# Altium PCB MainBoardPCB_BKP.PcbDoc (part 17 of 35)
Units mm, origin at the board's own origin, x right, y up, seen from the top; angles counter-clockwise.
Board outline 258.95 x 308.86 mm, 16 copper layers (L1, L2 (GND), L3 (Sign), L4 (GND), L5 (Sign), L6 (PWR/GND), L7(PWR/GND), L8 (Plane_GND), L9 (PWR/GND), L10 (PWR/GND), L11 (PWR/GND), L12 (Sign), L13 (GND), L14 (Sign), L15 (GND), L16), stack 2.502 mm thick; 2361 components, 1770 nets, 8410 pads, 3259 vias.
Unrouted connection lines stored in the file: 4700.
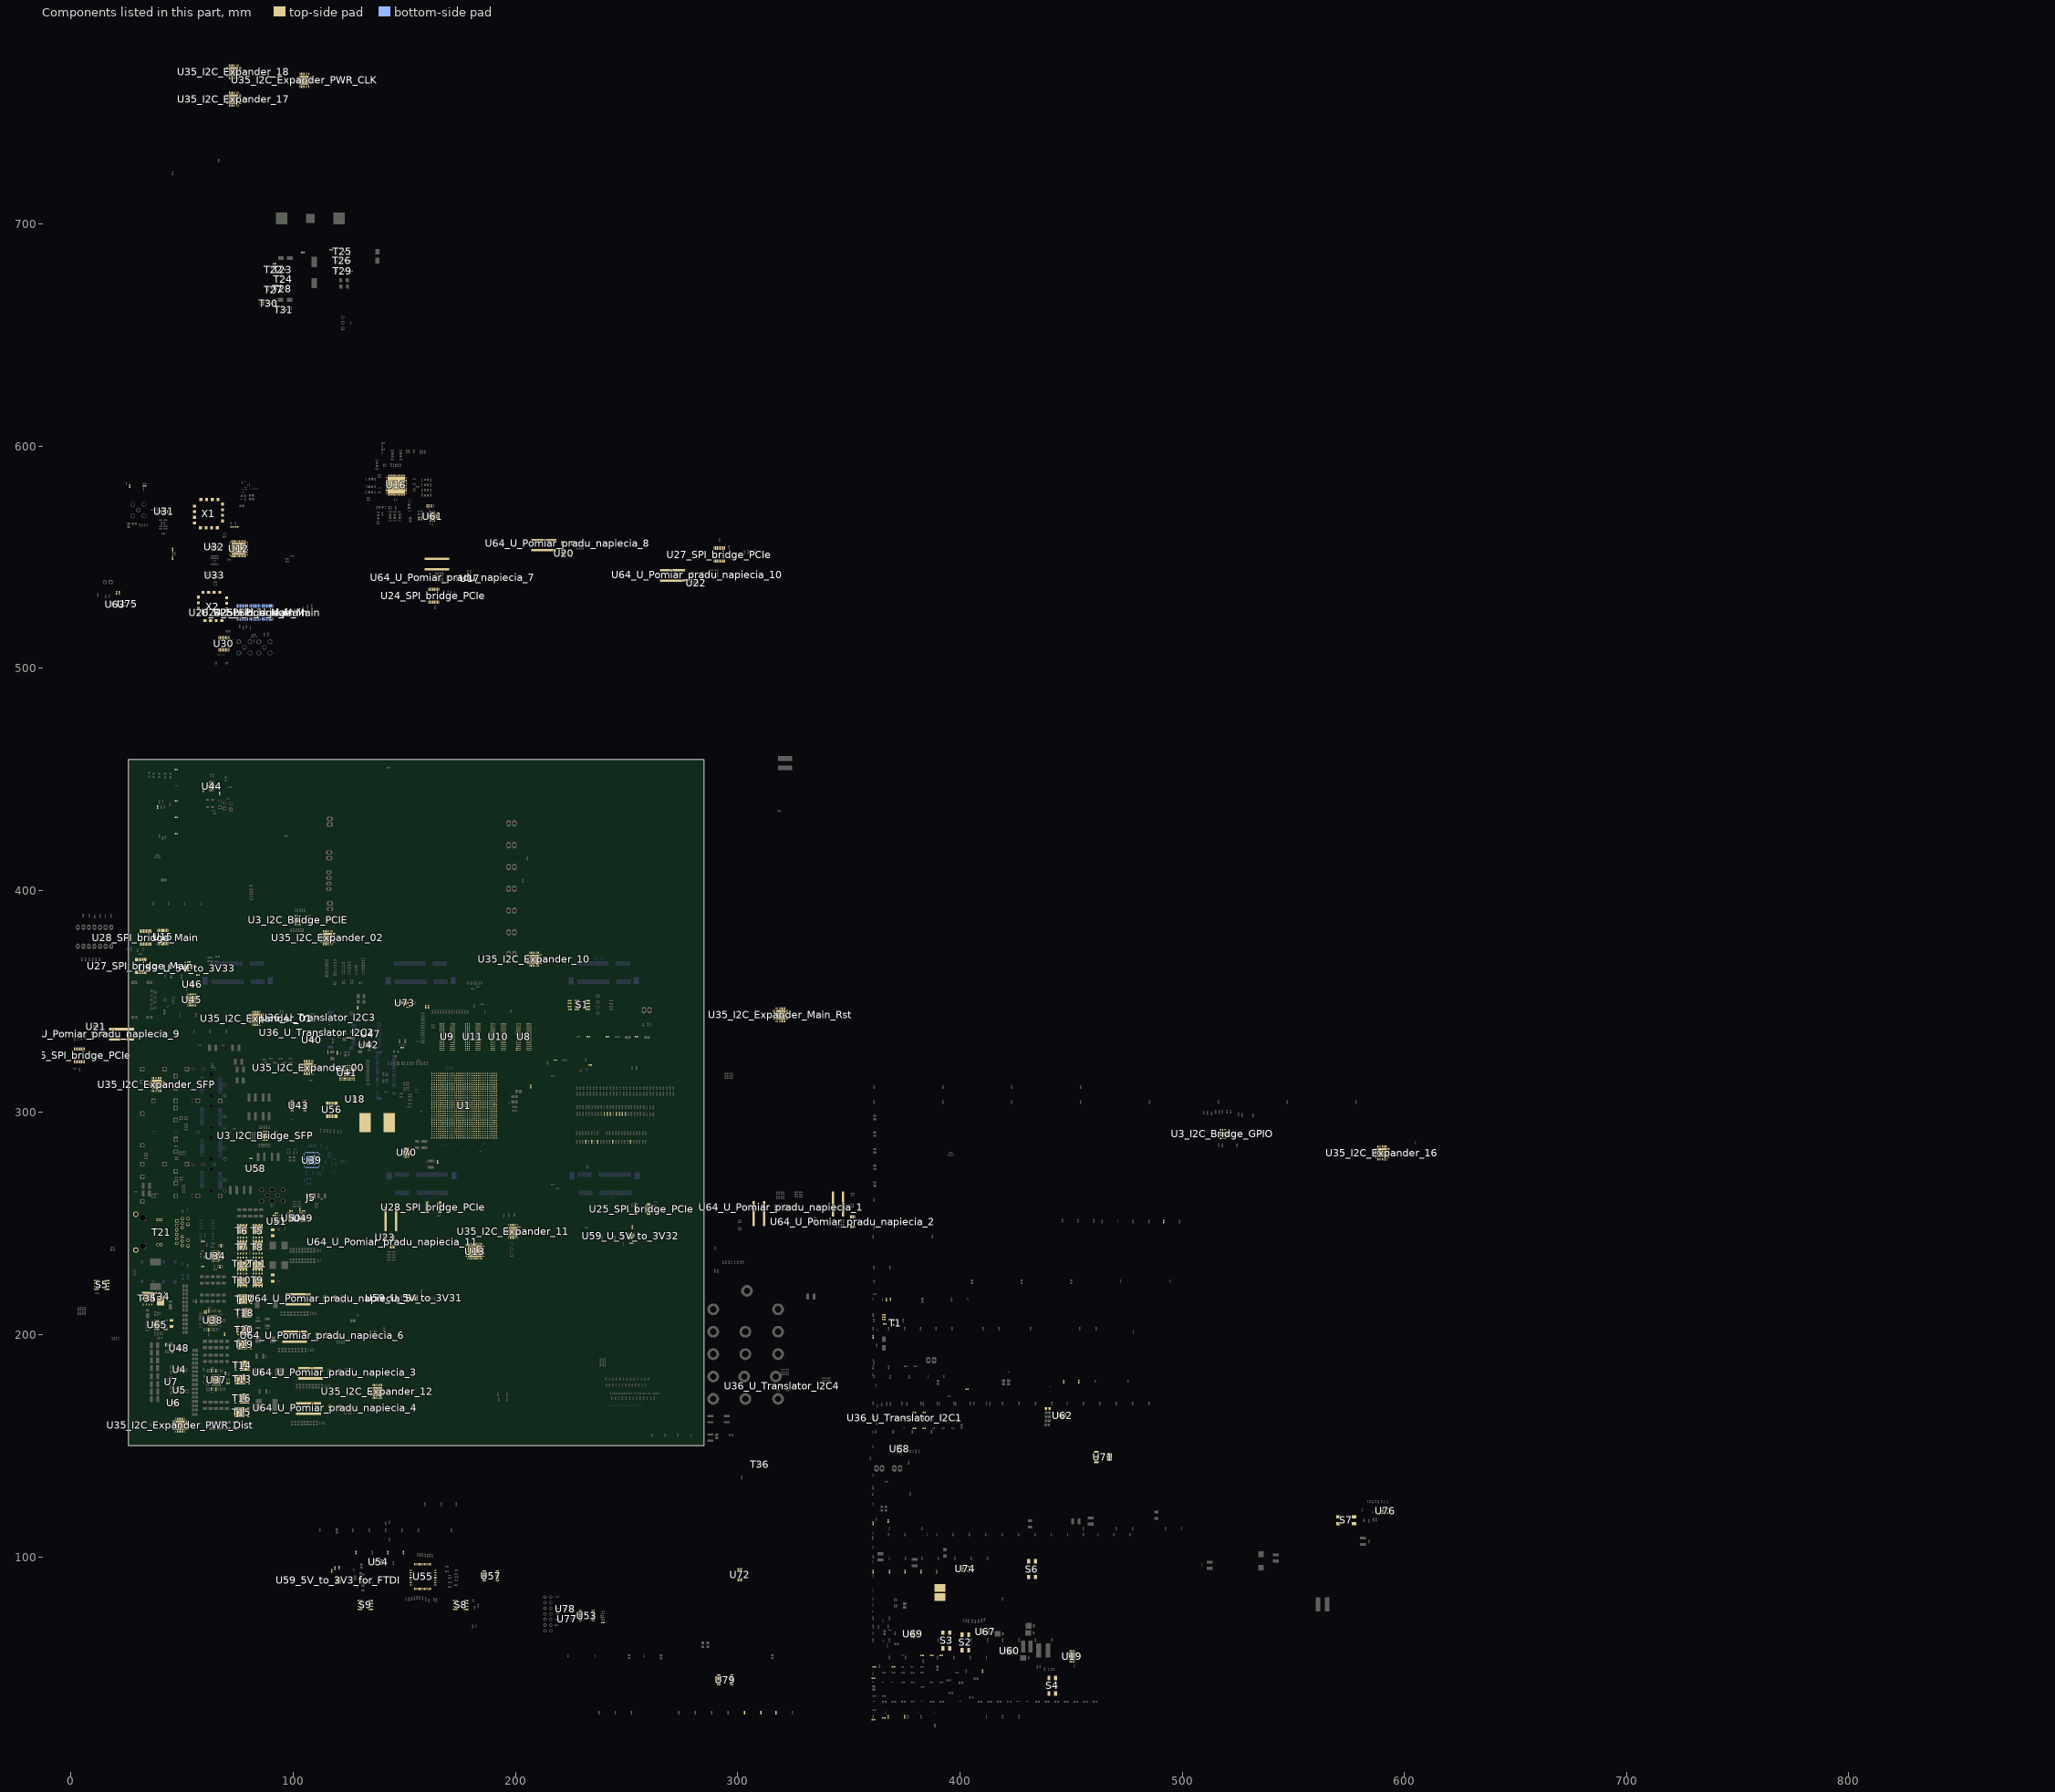
[diagram p21: the components of this part, seen from the top]

## Part data (continued)
R431_5V_to_3V3_for_FTDI R632 R633 R634 R646 R690 R825 R828: library part Resistor, Case/Package=0402, Case Code (Metric)=1005, Manufacturer 1=Panasonic, Manufacturer Part Number 1=ERA-2AED104X, Max Operating Temperature=155°C, Max Power Dissipation=63mW, Min Operating Temperature=-55°C, Package Quantity=10000, Supplier Part Number 1=P100KDECT-ND, Temperature Coefficient=25ppm/°C, Tolerance=0.5%, Voltage Rating=25V, Case Code (Imperial)=0402, ComponentLink1Description=https://datasheet.ciiva.com/24028/aoa0000ce26-197354-24028150.pdf?src-supplier=Mouser, ComponentLink1URL=https://datasheet.ciiva.com/24028/aoa0000ce26-197354-24028150.pdf?src-supplier=Mouser, ComponentLink2Description=https://datasheet.ciiva.com/43470/1776116-43470438.pdf?src-supplier=Farnell, ComponentLink2URL=https://datasheet.ciiva.com/43470/1776116-43470438.pdf?src-supplier=Farnell, ComponentLink3Description=https://datasheet.ciiva.com/7830/1776116-7830920.pdf?src-supplier=Element14, ComponentLink3URL=https://datasheet.ciiva.com/7830/1776116-7830920.pdf?src-supplier=Element14, ComponentLink4Description=https://datasheet.ciiva.com/46378/1776116-46378234.pdf?src-supplier=Element14, ComponentLink4URL=https://datasheet.ciiva.com/46378/1776116-46378234.pdf?src-supplier=Element14, ComponentLink5Description=https://datasheet.ciiva.com/16780/70068849-16780139.pdf?src-supplier=Allied+Electronics, ComponentLink5URL=https://datasheet.ciiva.com/16780/70068849-16780139.pdf?src-supplier=Allied+Electronics, ComponentLink6Description=https://datasheet.ciiva.com/9117/aoa0000ce26-9117229.pdf?src-supplier=Avnet, ComponentLink6URL=https://datasheet.ciiva.com/9117/aoa0000ce26-9117229.pdf?src-supplier=Avnet, ComponentLink7Description=https://datasheet.ciiva.com/16511/aoa0000ce26-16511566.pdf?src-supplier=Avnet+Asia, ComponentLink7URL=https://datasheet.ciiva.com/16511/aoa0000ce26-16511566.pdf?src-supplier=Avnet+Asia, ComponentLink8Description=https://datasheet.ciiva.com/30225/54aoa0000ce26-30225311.pdf?src-supplier=Onlinecomponents.com, ComponentLink8URL=https://datasheet.ciiva.com/30225/54aoa0000ce26-30225311.pdf?src-supplier=Onlinecomponents.com, Composition="Metal Film,Thin Film", Contact Plating=Tin, Depth=0.5mm, Height=0.016inch, Lead Free="Lead Free", Length=1mm, Military Standard=Not, Mount="Surface Mount", Number of Terminations=2, Packaging="Tape and Reel", Power Rating=63mW, Pricing 1="1=0.22000, 10=0.18800, 100=0.07350, 1000=0.03077, 2500=0.02820, 5000=0.02564 (USD)", Radiation Hardening=No, REACH SVHC="No SVHC", Resistance=100kR, RoHS=Yes, Stock 1=54338, Supplier 1=Digi-Key, Termination=SMD/SMT, Voltage Rating (DC)=25V, Width=0.5mm
R432_U_5V_to_3V31 R432_U_5V_to_3V32 R432_U_5V_to_3V33: library part Resistor, "RES 15K OHM 1% 1/16W 0402", Case Code (Imperial)=0402, Case Code (Metric)=1005, Manufacturer="Stackpole Electronics", Manufacturer Part Number=RMCF0402FT15K0, Max Operating Temperature=155°C, Max Power Dissipation=63mW, Min Operating Temperature=-55°C, Supplier Part Number 1=RMCF0402FT15K0CT-ND, Temperature Coefficient=100ppm/°C, Tolerance=1%, Case/Package=0402, Category="Chip SMD Resistors", ComponentLink1Description=http://www1.futureelectronics.com/doc/STACKPOLE%20ELECTRONICS/RMCF-1__16S-15K-1%25-R.pdf?src-supplier=Future+Electronics, ComponentLink1URL=http://www1.futureelectronics.com/doc/STACKPOLE%20ELECTRONICS/RMCF-1__16S-15K-1%25-R.pdf?src-supplier=Future+Electronics, ComponentLink2Description=http://components.arrow.com/part/dataview/50576585S147344N1174?src-supplier=Arrow, ComponentLink2URL=http://components.arrow.com/part/dataview/50576585S147344N1174?src-supplier=Arrow, ComponentLink3Description=https://www.seielect.com/catalog/sei-rmcf_rmcp.pdf?src-supplier=Digi-Key, ComponentLink3URL=https://www.seielect.com/catalog/sei-rmcf_rmcp.pdf?src-supplier=Digi-Key, ComponentLink4Description=https://www.seielect.com/catalog/SEI-RMCF_RMCP.pdf?src-supplier=Avnet, ComponentLink4URL=https://www.seielect.com/catalog/SEI-RMCF_RMCP.pdf?src-supplier=Avnet, Composition="Thick Film", Contact Plating=Tin,Matte, Features="Automotive AEC-Q200", Height=0.016inch, Lead Free="Lead Free", Length=0.039inch, Mount="Surface Mount", Number of Terminations=2, Packaging="Tape and Reel", Power Rating=63mW, Pricing 1="1=0,10000, 10=0,01400, 100=0,00580, 1000=0,00262, 2500=0,00228, 5000=0,00188 (USD)", Radiation Hardening=No, Resistance=15kR, RoHS=Yes, Stock 1=103132, Supplier 1=Digi-Key, Width=0.02inch
R433: library part Resistor, "RES 56K OHM 1% 1/16W 0402", Case Code (Imperial)=0402, Case Code (Metric)=1005, Manufacturer="Stackpole Electronics", Manufacturer Part Number=RMCF0402FT56K0, Max Operating Temperature=155°C, Max Power Dissipation=63mW, Min Operating Temperature=-55°C, Package Quantity=10000, Supplier Part Number 1=RMCF0402FT56K0CT-ND, Temperature Coefficient=100ppm/°C, Tolerance=1%, Case/Package=0402, Category="Chip SMD Resistors", ComponentLink1Description=https://www.seielect.com/catalog/SEI-RMCF_RMCP.pdf?src-supplier=Avnet, ComponentLink1URL=https://www.seielect.com/catalog/SEI-RMCF_RMCP.pdf?src-supplier=Avnet, ComponentLink2Description=http://www.seielect.com/Catalog/SEI-RMCF_RMCP.pdf?src-supplier=Digi-Key, ComponentLink2URL=http://www.seielect.com/Catalog/SEI-RMCF_RMCP.pdf?src-supplier=Digi-Key, ComponentLink3Description=https://www.seielect.com/catalog/SEI-Packaging.pdf?src-supplier=Digi-Key, ComponentLink3URL=https://www.seielect.com/catalog/SEI-Packaging.pdf?src-supplier=Digi-Key, ComponentLink4Description=https://www.seielect.com/Catalog/SEI-RMCF_RMCP.pdf?src-supplier=Digi-Key, ComponentLink4URL=https://www.seielect.com/Catalog/SEI-RMCF_RMCP.pdf?src-supplier=Digi-Key, Composition="Thick Film", Contact Plating=Tin,Matte, Features="Automotive AEC-Q200", Height=0.016inch, Length=0.039inch, Mount="Surface Mount", Number of Terminations=2, Packaging="Tape and Reel", Pricing 1="1=0,10000, 10=0,01400, 100=0,00580, 1000=0,00262, 2500=0,00228, 5000=0,00188 (USD)", Radiation Hardening=No, Resistance=56kR, RoHS=Yes, Stock 1=59738, Supplier 1=Digi-Key, Width=0.02inch
R434 R649 R651 R655 R656 R658: library part Resistor, "RES 10K OHM 0.1% 1/16W 0402", Case Code (Imperial)=0402, Case Code (Metric)=1005, Manufacturer="Stackpole Electronics", Manufacturer Part Number=RNCF0402BTE10K0, Max Operating Temperature=155°C, Max Power Dissipation=63mW, Min Operating Temperature=-55°C, Package Quantity=10000, Supplier Part Number 1=RNCF0402BTE10K0CT-ND, Temperature Coefficient=25ppm/°C, Tolerance=0.1%, Case/Package=0402, Category="Chip SMD Resistors", ComponentLink1Description=https://www.seielect.com/Catalog/SEI-rncf.pdf?src-supplier=Avnet, ComponentLink1URL=https://www.seielect.com/Catalog/SEI-rncf.pdf?src-supplier=Avnet, ComponentLink2Description=https://www.seielect.com/catalog/SEI-Packaging.pdf?src-supplier=Digi-Key, ComponentLink2URL=https://www.seielect.com/catalog/SEI-Packaging.pdf?src-supplier=Digi-Key, Composition="Thin Film", Contact Plating=Tin,Matte, Features="Moisture Resistant", Height=0.016inch, Length=0.039inch, Mount="Surface Mount", Number of Terminations=2, Packaging="Tape and Reel", Pricing 1="1=0,42000, 10=0,29900, 100=0,11950, 1000=0,05891, 2500=0,05457, 5000=0,04938 (USD)", Radiation Hardening=No, Resistance=10kR, RoHS=Yes, Stock 1=121200, Supplier 1=Digi-Key, Width=0.02inch
R435 R615: library part Resistor, Case/Package=0402, Case Code (Metric)=1005, Manufacturer=Yageo, Manufacturer Part Number=RC0402FR-0710KL, Max Operating Temperature=155°C, Min Operating Temperature=-55°C, Power Rating=62.5mW, Supplier Part Number 1=311-10.0KLRDKR-ND, Temperature Coefficient=100ppm/°C, Tolerance=1%, Voltage Rating=50V, Case Code (Imperial)=0402, ComponentLink1Description=https://datasheet.ciiva.com/7660/38568-7660787.pdf?src-supplier=Element14, ComponentLink1URL=https://datasheet.ciiva.com/7660/38568-7660787.pdf?src-supplier=Element14, ComponentLink2Description=https://datasheet.ciiva.com/7849/1784430-7849813.pdf?src-supplier=Element14, ComponentLink2URL=https://datasheet.ciiva.com/7849/1784430-7849813.pdf?src-supplier=Element14, ComponentLink3Description=https://datasheet.ciiva.com/7849/1686128-7849814.pdf?src-supplier=Element14, ComponentLink3URL=https://datasheet.ciiva.com/7849/1686128-7849814.pdf?src-supplier=Element14, ComponentLink4Description=https://datasheet.ciiva.com/7849/1784430-7849815.pdf?src-supplier=Element14, ComponentLink4URL=https://datasheet.ciiva.com/7849/1784430-7849815.pdf?src-supplier=Element14, ComponentLink5Description=https://datasheet.ciiva.com/22747/1018594-22747512.pdf?src-supplier=Element14, ComponentLink5URL=https://datasheet.ciiva.com/22747/1018594-22747512.pdf?src-supplier=Element14, ComponentLink6Description=https://datasheet.ciiva.com/12667/pyu-rc0402-51-rohs-l-6-r-12667067.pdf?src-supplier=Mouser, ComponentLink6URL=https://datasheet.ciiva.com/12667/pyu-rc0402-51-rohs-l-6-r-12667067.pdf?src-supplier=Mouser, ComponentLink7Description=https://datasheet.ciiva.com/7983/1018594-7983486.pdf?src-supplier=Element14, ComponentLink7URL=https://datasheet.ciiva.com/7983/1018594-7983486.pdf?src-supplier=Element14, Composition="Thick Film", Depth=0.5mm, Height=0.32mm, Lead Free="Lead Free", Lead Pitch=0.2mm, Length=1mm, Military Standard=Not, Number of Pins=2, Number of Terminations=2, Packaging="Tape and Reel", Pricing 1="1 = 0,10000, 10 = 0,01600, 100 = 0,00640, 1000 = 0,00289, 2500 = 0,00251, 5000 = 0,00207 (USD)", REACH SVHC="No SVHC", Resistance=10kR, RoHS=Yes, Stock 1=50506721, Supplier 1=Digi-Key, Termination=SMD/SMT, Voltage Rating (DC)=50V, Width=0.5mm, Working Voltage=50V
R436 R438: library part Resistor, "Thick Film Resistors - SMD 3.57K OHM 1%", Case Code (Imperial)=0402, Case Code (Metric)=1005, Manufacturer=Yageo, Manufacturer Part Number=RC0402FR-073K57L, Max Operating Temperature=155°C, Max Power Dissipation=63mW, Min Operating Temperature=-55°C, Power Rating=62.5mW, Supplier Part Number 1=YAG3150CT-ND, Temperature Coefficient=100ppm/°C, Tolerance=1%, Voltage Rating=50V, Case/Package=0402, Category="Chip SMD Resistors", ComponentLink1Description=https://datasheet.ciiva.com/16857/pyu-rc0402-51-rohs-l-6-16857623.pdf?src-supplier=Avnet+Europe, ComponentLink1URL=https://datasheet.ciiva.com/16857/pyu-rc0402-51-rohs-l-6-16857623.pdf?src-supplier=Avnet+Europe, ComponentLink2Description=https://datasheet.ciiva.com/8893/pyu-rc0402-51-rohs-l-6-8893597.pdf?src-supplier=Avnet, ComponentLink2URL=https://datasheet.ciiva.com/8893/pyu-rc0402-51-rohs-l-6-8893597.pdf?src-supplier=Avnet, Composition="Thick Film", Contact Plating=Tin,Matte, Depth=0.5mm, Features="Moisture Resistant", Height=0.016inch, Lead Free="Lead Free", Length=1mm, Military Standard=Not, Number of Terminations=2, Packaging="Tape and Reel", Pricing 1="1=0,10000, 10=0,01600, 100=0,00640, 1000=0,00289, 2500=0,00251, 5000=0,00207 (USD)", Resistance=3.57kR, RoHS=Yes, Stock 1=898047, Supplier 1=Digi-Key, Termination=SMD/SMT, Width=0.02inch, Working Voltage=50V
R437 R439: library part Resistor, "Res General Purpose Thick Film 0402 1.15K Ohm 1% 1/16W ±100ppm/°C Molded SMD Paper T/R", Case Code (Imperial)=0402, Case Code (Metric)=1005, Manufacturer=Yageo, Manufacturer Part Number=RC0402FR-071K15L, Max Operating Temperature=155°C, Max Power Dissipation=63mW, Min Operating Temperature=-55°C, Power Rating=62.5mW, Supplier Part Number 1=YAG3033CT-ND, Temperature Coefficient=100ppm/°C, Tolerance=1%, Voltage Rating=50V, Case/Package=0402, Category="Chip SMD Resistors", ComponentLink1Description=https://datasheet.ciiva.com/16856/pyu-rc0402-51-rohs-l-6-16856533.pdf?src-supplier=Avnet+Europe, ComponentLink1URL=https://datasheet.ciiva.com/16856/pyu-rc0402-51-rohs-l-6-16856533.pdf?src-supplier=Avnet+Europe, ComponentLink2Description=https://datasheet.ciiva.com/28418/pyu-rc0402-51-rohs-l-6-28418808.pdf?src-supplier=Avnet+Europe, ComponentLink2URL=https://datasheet.ciiva.com/28418/pyu-rc0402-51-rohs-l-6-28418808.pdf?src-supplier=Avnet+Europe, ComponentLink3Description=https://datasheet.ciiva.com/8895/pyu-rc0402-51-rohs-l-6-8895884.pdf?src-supplier=Avnet, ComponentLink3URL=https://datasheet.ciiva.com/8895/pyu-rc0402-51-rohs-l-6-8895884.pdf?src-supplier=Avnet, ComponentLink4Description=https://datasheet.ciiva.com/26829/getdatasheetpartid-326427-26829948.pdf?src-supplier=Verical, ComponentLink4URL=https://datasheet.ciiva.com/26829/getdatasheetpartid-326427-26829948.pdf?src-supplier=Verical, Composition="Thick Film", Contact Plating=Tin,Matte,Lead, Depth=0.5mm, Features="Moisture Resistant", Height=0.016inch, Lead Free="Lead Free", Length=1mm, Military Standard=Not, Number of Terminations=2, Packaging="Tape and Reel", Pricing 1="1=0,10000, 10=0,01600, 100=0,00640, 1000=0,00289, 2500=0,00251, 5000=0,00207 (USD)", Radiation Hardening=No, Resistance=1.15kR, RoHS=Yes, Stock 1=186720, Supplier 1=Digi-Key, Termination=SMD/SMT, Voltage Rating (DC)=50V, Width=0.02inch
R440 R441: library part Resistor, "RES SMD 20K OHM 1% 1/16W 0402", Case Code (Imperial)=0402, Case Code (Metric)=1005, Manufacturer=Vishay, Manufacturer Part Number=CRCW040220K0FKED, Max Operating Temperature=155°C, Max Power Dissipation=63mW, Min Operating Temperature=-55°C, Package Quantity=10, Supplier Part Number 1=51X8496, Temperature Coefficient=100ppm/°C, Tolerance=1%, Voltage Rating=50V, Case/Package=0402, Category="Chip SMD Resistors", ComponentLink1Description=https://datasheet.ciiva.com/11810/0900766b80d98824-11810023.pdf?src-supplier=RSComponents, ComponentLink1URL=https://datasheet.ciiva.com/11810/0900766b80d98824-11810023.pdf?src-supplier=RSComponents, ComponentLink2Description=https://datasheet.ciiva.com/2463/dcrcwe3-2463139.pdf?src-supplier=Digi-Key, ComponentLink2URL=https://datasheet.ciiva.com/2463/dcrcwe3-2463139.pdf?src-supplier=Digi-Key, ComponentLink3Description=https://datasheet.ciiva.com/2463/dcrcwe3-2463140.pdf?src-supplier=Digi-Key, ComponentLink3URL=https://datasheet.ciiva.com/2463/dcrcwe3-2463140.pdf?src-supplier=Digi-Key, ComponentLink4Description=https://datasheet.ciiva.com/16886/dcrcwe3-16886581.pdf?src-supplier=Avnet+Europe, ComponentLink4URL=https://datasheet.ciiva.com/16886/dcrcwe3-16886581.pdf?src-supplier=Avnet+Europe, ComponentLink5Description=https://datasheet.ciiva.com/15159/getdatasheetpartid-93312-15159927.pdf?src-supplier=Verical, ComponentLink5URL=https://datasheet.ciiva.com/15159/getdatasheetpartid-93312-15159927.pdf?src-supplier=Verical, ComponentLink6Description=https://datasheet.ciiva.com/2463/dcrcwe3-2463141.pdf?src-supplier=Digi-Key, ComponentLink6URL=https://datasheet.ciiva.com/2463/dcrcwe3-2463141.pdf?src-supplier=Digi-Key, ComponentLink7Description=https://datasheet.ciiva.com/3256/dcrcwe3-3256213.pdf?src-supplier=Avnet, ComponentLink7URL=https://datasheet.ciiva.com/3256/dcrcwe3-3256213.pdf?src-supplier=Avnet, ComponentLink8Description=https://datasheet.ciiva.com/16725/70201119-16725214.pdf?src-supplier=Allied+Electronics, ComponentLink8URL=https://datasheet.ciiva.com/16725/70201119-16725214.pdf?src-supplier=Allied+Electronics, Composition="Thick Film", Contact Plating=Tin, Depth=0.5mm, Features="Automotive AEC-Q200", Height=0.35mm, Lead Free="Lead Free", Length=1mm, Military Standard=Not, Mount="Surface Mount", Number of Pins=2, Number of Terminations=2, Packaging="Tape and Reel", Power Rating=63mW, Radiation Hardening=No, REACH SVHC=Unknown, Resistance=20kR, RoHS=Yes, Supplier 1=Newark, Termination=SMD/SMT, Voltage Rating (DC)=50V, Weight=2.3E-05oz, Width=0.5mm, Working Voltage=50V
R443: library part Resistor, "Panasonic ERA Series Thin Film Surface Mount Fixed Resistor 0805 Case 698k 0.1% 0.125W 25ppm/C", Case Code (Imperial)=0805, Case Code (Metric)=2012, Manufacturer=Panasonic, Manufacturer Part Number=ERA-6AEB6983V, Max Operating Temperature=155°C, Max Power Dissipation=125mW, Min Operating Temperature=-55°C, Package Quantity=5000, Supplier Part Number 1=P698KDACT-ND, Temperature Coefficient=25ppm/°C, Tolerance=0.1%, Voltage Rating=100V, Case/Package=0805, Category="Chip SMD Resistors", ComponentLink1Description=https://datasheet.ciiva.com/11810/0900766b80eb1d8c-11810720.pdf?src-supplier=RSComponents, ComponentLink1URL=https://datasheet.ciiva.com/11810/0900766b80eb1d8c-11810720.pdf?src-supplier=RSComponents, ComponentLink2Description=https://datasheet.ciiva.com/41450/001181413-da-01-en-widerstand-era-0805-698k-0-1-5000st-41450573.pdf?src-supplier=Conrad, ComponentLink2URL=https://datasheet.ciiva.com/41450/001181413-da-01-en-widerstand-era-0805-698k-0-1-5000st-41450573.pdf?src-supplier=Conrad, ComponentLink3Description=https://datasheet.ciiva.com/6138/485442-6138277.pdf?src-supplier=Farnell, ComponentLink3URL=https://datasheet.ciiva.com/6138/485442-6138277.pdf?src-supplier=Farnell, ComponentLink4Description=https://datasheet.ciiva.com/9180/aoa0000ce26-9180341.pdf?src-supplier=Avnet, ComponentLink4URL=https://datasheet.ciiva.com/9180/aoa0000ce26-9180341.pdf?src-supplier=Avnet, ComponentLink5Description=https://datasheet.ciiva.com/17205/aoa0000ce26-17205334.pdf?src-supplier=Avnet+Europe, ComponentLink5URL=https://datasheet.ciiva.com/17205/aoa0000ce26-17205334.pdf?src-supplier=Avnet+Europe, ComponentLink6Description=https://datasheet.ciiva.com/6138/485442-6138279.pdf?src-supplier=Farnell, ComponentLink6URL=https://datasheet.ciiva.com/6138/485442-6138279.pdf?src-supplier=Farnell, ComponentLink7Description=https://datasheet.ciiva.com/7753/485442-7753914.pdf?src-supplier=Element14, ComponentLink7URL=https://datasheet.ciiva.com/7753/485442-7753914.pdf?src-supplier=Element14, ComponentLink8Description=https://datasheet.ciiva.com/7753/485442-7753915.pdf?src-supplier=Element14, ComponentLink8URL=https://datasheet.ciiva.com/7753/485442-7753915.pdf?src-supplier=Element14, Composition="Thin Film,Metal Film", Contact Plating=Tin, Depth=1.25mm, Features="Automotive AEC-Q200", Height=0.5mm, Lead Free="Lead Free", Length=2mm, Mount="Surface Mount", Number of Pins=2, Number of Terminations=2, Packaging="Tape and Reel", Power Rating=125mW, Pricing 1="1=0,36000, 10=0,30200, 100=0,11820, 1000=0,04948, 2500=0,04536 (USD)", Radiation Hardening=No, REACH SVHC="No SVHC", Resistance=698kR, RoHS=Yes, Stock 1=9459, Supplier 1=Digi-Key, Termination=SMD/SMT, Voltage Rating (DC)=100V, Weight=0.000194oz, Width=1.25mm
R444 R445: library part Resistor, "Res Thin Film 0402 49.9K Ohm 0.1% 1/16W 25ppm/C Molded SMD SMD Punched Carrier T/R", Case Code (Imperial)=0402, Case Code (Metric)=1005, Manufacturer=Panasonic, Manufacturer Part Number=ERA-2AEB4992X, Max Operating Temperature=155°C, Max Power Dissipation=63mW, Min Operating Temperature=-55°C, Package Quantity=1, Power Rating=62.5mW, Supplier Part Number 1=P49.9KDCCT-ND, Temperature Coefficient=25ppm/°C, Tolerance=0.1%, Voltage Rating=50V, Case/Package=0402, Category="Chip SMD Resistors", ComponentLink1Description=https://datasheet.ciiva.com/9189/aoa0000ce26-9189149.pdf?src-supplier=Avnet, ComponentLink1URL=https://datasheet.ciiva.com/9189/aoa0000ce26-9189149.pdf?src-supplier=Avnet, Composition="Thin Film", Contact Plating=Tin, Depth=0.5mm, Features="Automotive AEC-Q200", Height=0.016inch, Lead Free="Lead Free", Length=1mm, Military Standard=Not, Mount="Surface Mount", Number of Terminations=2, Packaging="Tape and Reel", Pricing 1="1=0,43000, 10=0,30500, 100=0,12220, 1000=0,06021, 2500=0,05579, 5000=0,05047 (USD)", REACH SVHC=Unknown, Resistance=49.9kR, RoHS=Yes, Stock 1=70823, Supplier 1=Digi-Key, Voltage Rating (DC)=50V, Width=0.02inch
R446 R447: library part Resistor, "RES SMD 120 OHM 1% 1/16W 0402", Case/Package=0402, Case Code (Metric)=1005, Manufacturer=Vishay, Manufacturer Part Number=CRCW0402120RFKED, Max Operating Temperature=155°C, Max Power Dissipation=63mW, Min Operating Temperature=-55°C, Package Quantity=10000, Supplier Part Number 1=541-120LCT-ND, Temperature Coefficient=100ppm/°C, Tolerance=1%, Voltage Rating=50V, Case Code (Imperial)=0402, Category="Chip SMD Resistors", ComponentLink1Description=https://datasheet.ciiva.com/11817/0900766b80d98824-11817989.pdf?src-supplier=RSComponents, ComponentLink1URL=https://datasheet.ciiva.com/11817/0900766b80d98824-11817989.pdf?src-supplier=RSComponents, ComponentLink2Description=https://datasheet.ciiva.com/2463/dcrcwe3-2463109.pdf?src-supplier=Digi-Key, ComponentLink2URL=https://datasheet.ciiva.com/2463/dcrcwe3-2463109.pdf?src-supplier=Digi-Key, ComponentLink3Description=https://datasheet.ciiva.com/8336/dcrcwe3-8336661.pdf?src-supplier=Avnet, ComponentLink3URL=https://datasheet.ciiva.com/8336/dcrcwe3-8336661.pdf?src-supplier=Avnet, ComponentLink4Description=https://datasheet.ciiva.com/2463/dcrcwe3-2463110.pdf?src-supplier=Digi-Key, ComponentLink4URL=https://datasheet.ciiva.com/2463/dcrcwe3-2463110.pdf?src-supplier=Digi-Key, ComponentLink5Description=https://datasheet.ciiva.com/5550/dcrcwe3-109170-5550502.pdf?src-supplier=Mouser, ComponentLink5URL=https://datasheet.ciiva.com/5550/dcrcwe3-109170-5550502.pdf?src-supplier=Mouser, ComponentLink6Description=https://datasheet.ciiva.com/2463/dcrcwe3-2463111.pdf?src-supplier=Digi-Key, ComponentLink6URL=https://datasheet.ciiva.com/2463/dcrcwe3-2463111.pdf?src-supplier=Digi-Key, ComponentLink7Description=https://datasheet.ciiva.com/3256/dcrcwe3-3256009.pdf?src-supplier=Avnet, ComponentLink7URL=https://datasheet.ciiva.com/3256/dcrcwe3-3256009.pdf?src-supplier=Avnet, ComponentLink8Description=https://datasheet.ciiva.com/7777/1697337-7777194.pdf?src-supplier=Element14, ComponentLink8URL=https://datasheet.ciiva.com/7777/1697337-7777194.pdf?src-supplier=Element14, ComponentLink9Description=https://datasheet.ciiva.com/7777/1697337-7777195.pdf?src-supplier=Element14, ComponentLink9URL=https://datasheet.ciiva.com/7777/1697337-7777195.pdf?src-supplier=Element14, ComponentLink10Description=https://datasheet.ciiva.com/16881/dcrcwe3-16881548.pdf?src-supplier=Avnet+Europe, ComponentLink10URL=https://datasheet.ciiva.com/16881/dcrcwe3-16881548.pdf?src-supplier=Avnet+Europe, ComponentLink11Description=https://datasheet.ciiva.com/16199/dcrcwe3-16199070.pdf?src-supplier=Future+Electronics, ComponentLink11URL=https://datasheet.ciiva.com/16199/dcrcwe3-16199070.pdf?src-supplier=Future+Electronics, ComponentLink12Description=https://datasheet.ciiva.com/22674/1912744-22674687.pdf?src-supplier=Element14, ComponentLink12URL=https://datasheet.ciiva.com/22674/1912744-22674687.pdf?src-supplier=Element14, Composition="Thick Film", Contact Plating=Tin, Depth=0.5mm, Features="Automotive AEC-Q200", Height=0.35mm, Lead Free="Lead Free", Length=1mm, Military Standard=Not, Mount="Surface Mount", Number of Terminations=2, Packaging="Tape and Reel", Power Rating=63mW, Pricing 1="1=0,10000, 10=0,03600, 100=0,01460, 1000=0,00657, 2500=0,00570, 5000=0,00471 (USD)", Radiation Hardening=No, REACH SVHC=Unknown, Resistance=120R, RoHS=Yes, Stock 1=140153, Supplier 1=Digi-Key, Termination=SMD/SMT, Voltage Rating (DC)=50V, Weight=2.3E-05oz, Width=0.02inch, Working Voltage=50V
R448_U_Pomiar_pradu_napiecia_1 R448_U_Pomiar_pradu_napiecia_2 R448_U_Pomiar_pradu_napiecia_3 R448_U_Pomiar_pradu_napiecia_4 R448_U_Pomiar_pradu_napiecia_5 R448_U_Pomiar_pradu_napiecia_6 R448_U_Pomiar_pradu_napiecia_7 R448_U_Pomiar_pradu_napiecia_8 R448_U_Pomiar_pradu_napiecia_9 R448_U_Pomiar_pradu_napiecia_10 R448_U_Pomiar_pradu_napiecia_11: "RES SMD 5 MOHM 5W 4320 WIDE", Case/Package=Metal, Manufacturer=Ohmite, Max Operating Temperature=155°C, Max Power Dissipation=5W, Min Operating Temperature=-55°C, Package Quantity=1, Resistance=5mR, Supplier Part Number 1=FCSL110R005FERCT-ND, Temperature Coefficient=50ppm/°C, Tolerance=1%, ComponentLink1Description=https://datasheet.ciiva.com/2484/res-fcsl-2484643.pdf?src-supplier=Digi-Key, ComponentLink1URL=https://datasheet.ciiva.com/2484/res-fcsl-2484643.pdf?src-supplier=Digi-Key, ComponentLink2Description=https://datasheet.ciiva.com/2484/res-fcsl-2484644.pdf?src-supplier=Digi-Key, ComponentLink2URL=https://datasheet.ciiva.com/2484/res-fcsl-2484644.pdf?src-supplier=Digi-Key, ComponentLink3Description=https://datasheet.ciiva.com/2484/res-fcsl-2484645.pdf?src-supplier=Digi-Key, ComponentLink3URL=https://datasheet.ciiva.com/2484/res-fcsl-2484645.pdf?src-supplier=Digi-Key, ComponentLink4Description=https://datasheet.ciiva.com/6181/fcsl-6181333.pdf?src-supplier=Farnell, ComponentLink4URL=https://datasheet.ciiva.com/6181/fcsl-6181333.pdf?src-supplier=Farnell, ComponentLink5Description=https://datasheet.ciiva.com/46422/1812595-46422917.pdf?src-supplier=Element14, ComponentLink5URL=https://datasheet.ciiva.com/46422/1812595-46422917.pdf?src-supplier=Element14, ComponentLink6Description=https://datasheet.ciiva.com/8080/fcsl-8080343.pdf?src-supplier=Element14, ComponentLink6URL=https://datasheet.ciiva.com/8080/fcsl-8080343.pdf?src-supplier=Element14, Composition="Metal Foil", Depth=5mm, Features="Moisture Resistant", Height=0.028inch, Length=0.197inch, Manufacturer Part Number=FCSL110R005FER, Number of Pins=2, Number of Terminations=2, Packaging="Tape and Reel", Power Rating=5W, Pricing 1="1 = 2,79000, 10 = 2,47700, 25 = 2,29720, 50 = 2,16220, 100 = 1,89190, 250 = 1,62164, 500 = 1,35136 (USD)", REACH SVHC=Unknown, RoHS=Yes, Stock 1=3877, Supplier 1=Digi-Key, Termination=SMD/SMT, Width=11mm
R491: library part Resistor, Case/Package=0402, Case Code (Metric)=1005, Manufacturer=Panasonic, Manufacturer Part Number=ERJ-2GEJ105X, Max Operating Temperature=155°C, Max Power Dissipation=100mW, Min Operating Temperature=-55°C, Package Quantity=1, Supplier Part Number 1=P1.0MJCT-ND, Temperature Coefficient=200ppm/°C, Tolerance=5%, Voltage Rating=50V, Case Code (Imperial)=0402, ComponentLink1Description=https://datasheet.ciiva.com/11821/0900766b80f806dd-11821228.pdf?src-supplier=RSComponents, ComponentLink1URL=https://datasheet.ciiva.com/11821/0900766b80f806dd-11821228.pdf?src-supplier=RSComponents, ComponentLink2Description=https://datasheet.ciiva.com/16511/aoa0000ce1-16511430.pdf?src-supplier=Avnet+Asia, ComponentLink2URL=https://datasheet.ciiva.com/16511/aoa0000ce1-16511430.pdf?src-supplier=Avnet+Asia, ComponentLink3Description=https://datasheet.ciiva.com/16767/70260739-16767558.pdf?src-supplier=Allied+Electronics, ComponentLink3URL=https://datasheet.ciiva.com/16767/70260739-16767558.pdf?src-supplier=Allied+Electronics, ComponentLink4Description=https://datasheet.ciiva.com/17215/aoa0000ce1-17215240.pdf?src-supplier=Avnet+Europe, ComponentLink4URL=https://datasheet.ciiva.com/17215/aoa0000ce1-17215240.pdf?src-supplier=Avnet+Europe, ComponentLink5Description=https://datasheet.ciiva.com/46374/1500035-46374248.pdf?src-supplier=Element14, ComponentLink5URL=https://datasheet.ciiva.com/46374/1500035-46374248.pdf?src-supplier=Element14, ComponentLink6Description=https://datasheet.ciiva.com/16495/aoa0000ce1-16495211.pdf?src-supplier=Future+Electronics, ComponentLink6URL=https://datasheet.ciiva.com/16495/aoa0000ce1-16495211.pdf?src-supplier=Future+Electronics, Composition="Thick Film", Contact Plating=Tin, Depth=0.5mm, Features="Automotive AEC-Q200", Height=0.35mm, Lead Free="Lead Free", Length=1mm, Military Standard=Not, Mount="Surface Mount", Number of Terminations=2, Packaging="Tape and Reel", Power Rating=100mW, Pricing 1="1 = 0,10000, 10 = 0,02700, 100 = 0,01100, 1000 = 0,00496, 2500 = 0,00430, 5000 = 0,00355 (USD)", Radiation Hardening=No, REACH SVHC="No SVHC", Resistance=1MR, RoHS=Yes, Stock 1=342385, Supplier 1=Digi-Key, Termination=SMD/SMT, Voltage Rating (DC)=50V, Width=0.5mm
R515 R522 R523 R531 R546 R548 R549 R551 R552 R554 R555 R557: library part Resistor, Case Code (Imperial)=0402, Case Code (Metric)=1005, Manufacturer 1=Yageo, Manufacturer Part Number 1=RC0402FR-0710KL, Max Operating Temperature=155°C, Min Operating Temperature=-55°C, Power Rating=62.5mW, Supplier Part Number 1=311-10.0KLRCT-ND, Temperature Coefficient=100ppm/°C, Tolerance=1%, Voltage Rating=50V, Case/Package=0402, ComponentLink1Description=https://datasheet.ciiva.com/7660/38568-7660787.pdf?src-supplier=Element14, ComponentLink1URL=https://datasheet.ciiva.com/7660/38568-7660787.pdf?src-supplier=Element14, ComponentLink2Description=https://datasheet.ciiva.com/7849/1784430-7849813.pdf?src-supplier=Element14, ComponentLink2URL=https://datasheet.ciiva.com/7849/1784430-7849813.pdf?src-supplier=Element14, ComponentLink3Description=https://datasheet.ciiva.com/7849/1686128-7849814.pdf?src-supplier=Element14, ComponentLink3URL=https://datasheet.ciiva.com/7849/1686128-7849814.pdf?src-supplier=Element14, ComponentLink4Description=https://datasheet.ciiva.com/7849/1784430-7849815.pdf?src-supplier=Element14, ComponentLink4URL=https://datasheet.ciiva.com/7849/1784430-7849815.pdf?src-supplier=Element14, ComponentLink5Description=https://datasheet.ciiva.com/22747/1018594-22747512.pdf?src-supplier=Element14, ComponentLink5URL=https://datasheet.ciiva.com/22747/1018594-22747512.pdf?src-supplier=Element14, ComponentLink6Description=https://datasheet.ciiva.com/12667/pyu-rc0402-51-rohs-l-6-r-12667067.pdf?src-supplier=Mouser, ComponentLink6URL=https://datasheet.ciiva.com/12667/pyu-rc0402-51-rohs-l-6-r-12667067.pdf?src-supplier=Mouser, ComponentLink7Description=https://datasheet.ciiva.com/7983/1018594-7983486.pdf?src-supplier=Element14, ComponentLink7URL=https://datasheet.ciiva.com/7983/1018594-7983486.pdf?src-supplier=Element14, Composition="Thick Film", Depth=0.5mm, Height=0.32mm, Lead Free="Lead Free", Lead Pitch=0.2mm, Length=1mm, Military Standard=Not, Number of Pins=2, Number of Terminations=2, Packaging="Tape and Reel", Pricing 1="1=0,10000, 10=0,01500, 100=0,00600, 1000=0,00270, 2500=0,00235, 5000=0,00194 (USD)", REACH SVHC="No SVHC", Resistance=10kR, RoHS=Yes, Stock 1=71214322, Supplier 1=Digi-Key, Termination=SMD/SMT, Voltage Rating (DC)=50V, Width=0.5mm, Working Voltage=50V
R532: library part Resistor, "Res Thick Film 0402 75 Ohm 1% 1/10W 100ppm/C Molded SMD SMD Punched Carrier T/R", Case Code (Imperial)=0402, Case Code (Metric)=1005, Manufacturer=Panasonic, Manufacturer Part Number=ERJ-2RKF75R0X, Max Operating Temperature=155°C, Max Power Dissipation=100mW, Min Operating Temperature=-55°C, Package Quantity=1, Supplier Part Number 1=P75.0LDKR-ND, Temperature Coefficient=100ppm/°C, Tolerance=1%, Voltage Rating=50V, Case/Package=0402, Category="Chip SMD Resistors", ComponentLink1Description=https://datasheet.ciiva.com/11821/0900766b80f80784-11821360.pdf?src-supplier=RSComponents, ComponentLink1URL=https://datasheet.ciiva.com/11821/0900766b80f80784-11821360.pdf?src-supplier=RSComponents, ComponentLink2Description=https://datasheet.ciiva.com/30254/aoa0000ce2-30254694.pdf?src-supplier=Onlinecomponents.com, ComponentLink2URL=https://datasheet.ciiva.com/30254/aoa0000ce2-30254694.pdf?src-supplier=Onlinecomponents.com, ComponentLink3Description=https://datasheet.ciiva.com/43460/426256-43460278.pdf?src-supplier=Farnell, ComponentLink3URL=https://datasheet.ciiva.com/43460/426256-43460278.pdf?src-supplier=Farnell, ComponentLink4Description=https://datasheet.ciiva.com/16777/70260748-16777802.pdf?src-supplier=Allied+Electronics, ComponentLink4URL=https://datasheet.ciiva.com/16777/70260748-16777802.pdf?src-supplier=Allied+Electronics, ComponentLink5Description=https://datasheet.ciiva.com/24071/aoa0000ce2-24071598.pdf?src-supplier=Mouser, ComponentLink5URL=https://datasheet.ciiva.com/24071/aoa0000ce2-24071598.pdf?src-supplier=Mouser, ComponentLink6Description=https://datasheet.ciiva.com/16772/70260748-16772175.pdf?src-supplier=Allied+Electronics, ComponentLink6URL=https://datasheet.ciiva.com/16772/70260748-16772175.pdf?src-supplier=Allied+Electronics, ComponentLink7Description=https://datasheet.ciiva.com/46377/426256-46377007.pdf?src-supplier=Element14, ComponentLink7URL=https://datasheet.ciiva.com/46377/426256-46377007.pdf?src-supplier=Element14, ComponentLink8Description=https://datasheet.ciiva.com/48531/aoa0000ce2-48531055.pdf?src-supplier=Avnet, ComponentLink8URL=https://datasheet.ciiva.com/48531/aoa0000ce2-48531055.pdf?src-supplier=Avnet, ComponentLink9Description=https://datasheet.ciiva.com/5917/426256-5917818.pdf?src-supplier=Farnell, ComponentLink9URL=https://datasheet.ciiva.com/5917/426256-5917818.pdf?src-supplier=Farnell, ComponentLink10Description=https://datasheet.ciiva.com/46388/426256-46388476.pdf?src-supplier=Element14, ComponentLink10URL=https://datasheet.ciiva.com/46388/426256-46388476.pdf?src-supplier=Element14, ComponentLink11Description=https://datasheet.ciiva.com/9187/aoa0000ce2-9187662.pdf?src-supplier=Avnet, ComponentLink11URL=https://datasheet.ciiva.com/9187/aoa0000ce2-9187662.pdf?src-supplier=Avnet, Composition="Thick Film", Contact Plating=Tin, Depth=0.5mm, Features="Automotive AEC-Q200", Height=0.35mm, Lead Free="Lead Free", Length=1mm, Military Standard=Not, Mount="Surface Mount", Number of Terminations=2, Packaging="Tape and Reel", Power Rating=100mW, Pricing 1="1=0,10000, 10=0,04000, 100=0,01620, 1000=0,00729, 2500=0,00632, 5000=0,00523 (USD)", Radiation Hardening=No, REACH SVHC="No SVHC", Resistance=75R, RoHS=Yes, Stock 1=1175660, Supplier 1=Digi-Key, Termination=SMD/SMT, Voltage Rating (DC)=50V, Width=0.02inch
R533: library part Resistor, "RES 30 OHM 1% 1/16W 0402", Case/Package=0402, Manufacturer="Stackpole Electronics", Manufacturer Part Number=RMCF0402FT30R0, Max Operating Temperature=155°C, Min Operating Temperature=-55°C, Supplier Part Number 1=RMCF0402FT30R0CT-ND, Temperature Coefficient=100ppm/°C, Tolerance=1%, Category="Chip SMD Resistors", ComponentLink1Description=https://www.seielect.com/catalog/SEI-Packaging.pdf?src-supplier=Digi-Key, ComponentLink1URL=https://www.seielect.com/catalog/SEI-Packaging.pdf?src-supplier=Digi-Key, ComponentLink2Description=https://www.seielect.com/catalog/SEI-RMCF_RMCP.pdf?src-supplier=Avnet, ComponentLink2URL=https://www.seielect.com/catalog/SEI-RMCF_RMCP.pdf?src-supplier=Avnet, Composition="Thick Film", Contact Plating=Tin,Matte, Mount="Surface Mount", Packaging="Tape and Reel", Pricing 1="1=0,10000, 10=0,01400, 100=0,00580, 1000=0,00262, 2500=0,00228, 5000=0,00188 (USD)", Radiation Hardening=No, Resistance=30R, RoHS=Yes, Stock 1=30664, Supplier 1=Digi-Key
R608 R609: library part Resistor, "RES 10K OHM 0.1% 1/16W 0402", Case/Package=0402, Case Code (Metric)=1005, Manufacturer="Stackpole Electronics", Manufacturer Part Number=RNCF0402BTE10K0, Max Operating Temperature=155°C, Max Power Dissipation=63mW, Min Operating Temperature=-55°C, Package Quantity=10000, Supplier Part Number 1=RNCF0402BTE10K0CT-ND, Temperature Coefficient=25ppm/°C, Tolerance=0.1%, Case Code (Imperial)=0402, Category="Chip SMD Resistors", ComponentLink1Description=https://www.seielect.com/Catalog/SEI-rncf.pdf?src-supplier=Avnet, ComponentLink1URL=https://www.seielect.com/Catalog/SEI-rncf.pdf?src-supplier=Avnet, ComponentLink2Description=https://www.seielect.com/catalog/SEI-Packaging.pdf?src-supplier=Digi-Key, ComponentLink2URL=https://www.seielect.com/catalog/SEI-Packaging.pdf?src-supplier=Digi-Key, Composition="Thin Film", Contact Plating=Tin,Matte, Features="Moisture Resistant", Height=0.016inch, Length=0.039inch, Mount="Surface Mount", Number of Terminations=2, Packaging="Tape and Reel", Pricing 1="1=0,42000, 10=0,29900, 100=0,11950, 1000=0,05891, 2500=0,05457, 5000=0,04938 (USD)", Radiation Hardening=No, Resistance=10kR, RoHS=Yes, Stock 1=121200, Supplier 1=Digi-Key, Width=0.02inch
R610 R611: library part Resistor, Case/Package=0402, Case Code (Metric)=1005, Manufacturer=Yageo, Manufacturer Part Number=RC0402FR-071K33L, Max Operating Temperature=155°C, Max Power Dissipation=63mW, Min Operating Temperature=-55°C, Package Quantity=1, Power Rating=62.5mW, Supplier Part Number 1=311-1.33KLRCT-ND, Temperature Coefficient=100ppm/°C, Tolerance=1%, Voltage Rating=50V, Case Code (Imperial)=0402, ComponentLink1Description=https://datasheet.ciiva.com/2508/pyu-r-int-thick-7-2508289.pdf?src-supplier=Digi-Key, ComponentLink1URL=https://datasheet.ciiva.com/2508/pyu-r-int-thick-7-2508289.pdf?src-supplier=Digi-Key, ComponentLink2Description=https://datasheet.ciiva.com/2508/pyu-r-int-thick-7-2508290.pdf?src-supplier=Digi-Key, ComponentLink2URL=https://datasheet.ciiva.com/2508/pyu-r-int-thick-7-2508290.pdf?src-supplier=Digi-Key, ComponentLink3Description=https://datasheet.ciiva.com/2508/pyu-r-int-thick-7-2508291.pdf?src-supplier=Digi-Key, ComponentLink3URL=https://datasheet.ciiva.com/2508/pyu-r-int-thick-7-2508291.pdf?src-supplier=Digi-Key, ComponentLink4Description=https://datasheet.ciiva.com/16856/pyu-rc0402-51-rohs-l-6-16856582.pdf?src-supplier=Avnet+Europe, ComponentLink4URL=https://datasheet.ciiva.com/16856/pyu-rc0402-51-rohs-l-6-16856582.pdf?src-supplier=Avnet+Europe, ComponentLink5Description=https://datasheet.ciiva.com/8895/pyu-rc0402-51-rohs-l-6-8895561.pdf?src-supplier=Avnet, ComponentLink5URL=https://datasheet.ciiva.com/8895/pyu-rc0402-51-rohs-l-6-8895561.pdf?src-supplier=Avnet, ComponentLink6Description=https://datasheet.ciiva.com/17423/pyu-rc0402-51-rohs-l-6-r-17423946.pdf?src-supplier=Future+Electronics, ComponentLink6URL=https://datasheet.ciiva.com/17423/pyu-rc0402-51-rohs-l-6-r-17423946.pdf?src-supplier=Future+Electronics, ComponentLink7Description=https://datasheet.ciiva.com/28417/pyu-rc0402-51-rohs-l-6-28417821.pdf?src-supplier=Avnet+Europe, ComponentLink7URL=https://datasheet.ciiva.com/28417/pyu-rc0402-51-rohs-l-6-28417821.pdf?src-supplier=Avnet+Europe, Composition="Thick Film", Contact Plating=Tin,Matte,Lead, Depth=0.5mm, Features="Moisture Resistant", Height=0.016inch, Lead Free="Lead Free", Length=1mm, Military Standard=Not, Number of Terminations=2, Packaging="Tape and Reel", Pricing 1="1 = 0,10000, 10 = 0,01600, 100 = 0,00640, 1000 = 0,00289, 2500 = 0,00251, 5000 = 0,00207 (USD)", Radiation Hardening=No, Resistance=1.33kR, RoHS=Yes, Stock 1=189358, Supplier 1=Digi-Key, Termination=SMD/SMT, Width=0.02inch
R612 R614: library part Resistor, Case/Package=0402, Manufacturer="Vishay BCcomponents", Manufacturer Part Number=MCS04020C2203FE000, Max Operating Temperature=125°C, Min Operating Temperature=-55°C, Supplier Part Number 1=749-1566-1-ND, Temperature Coefficient=50ppm/°C, Tolerance=1%, ComponentLink1Description=https://datasheet.ciiva.com/16892/mc-pro-16892747.pdf?src-supplier=Avnet+Europe, ComponentLink1URL=https://datasheet.ciiva.com/16892/mc-pro-16892747.pdf?src-supplier=Avnet+Europe, Composition="Thin Film", Contact Plating=Tin, Depth=0.5mm, Lead Free="Lead Free", Length=1mm, Military Standard=Not, Packaging="Tape and Reel", Pricing 1="1 = 0,29000, 10 = 0,24200, 100 = 0,09460, 1000 = 0,03960, 2500 = 0,03630, 5000 = 0,03300 (USD)", Radiation Hardening=No, Resistance=270R, RoHS=Yes, Stock 1=29254, Supplier 1=Digi-Key, Width=500um
R613 R616: library part Resistor, Case/Package=1206, Case Code (Metric)=3216, Manufacturer="Vishay Dale", Manufacturer Part Number=CRCW12062R40FKEAHP, Max Operating Temperature=155°C, Max Power Dissipation=500mW, Min Operating Temperature=-55°C, Supplier Part Number 1=541-2.40UCT-ND, Temperature Coefficient=100ppm/°C, Tolerance=1%, Case Code (Imperial)=1206, ComponentLink1Description=http://www.vishay.com/docs/20043/crcwhpe3.pdf?src-supplier=Digi-Key, ComponentLink1URL=http://www.vishay.com/docs/20043/crcwhpe3.pdf?src-supplier=Digi-Key, Composition="Thick Film", Features="Automotive AEC-Q200", Height=0.026inch, Lead Free="Lead Free", Length=0.122inch, Number of Terminations=2, Packaging="Cut Tape", Pricing 1="1 = 0,43000, 10 = 0,32600, 100 = 0,13720, 1000 = 0,07568, 2500 = 0,07095 (USD)", Resistance=2.4R, RoHS=Yes, Stock 1=24526, Supplier 1=Digi-Key, Width=0.063inch
R617: "RES 0.004 OHM 1% 7W 5931", Case/Package=5931, Manufacturer=Yageo, Max Operating Temperature=170°C, Max Power Dissipation=7W, Min Operating Temperature=-65°C, Resistance=4mR, Supplier Part Number 1=YAG4096CT-ND, Temperature Coefficient=75ppm/°C, Tolerance=1%, Category="Chip SMD Resistors", ComponentLink1Description=http://www.yageo.com/documents/recent/PYu-PU_51_RoHS_L_6.pdf?src-supplier=Digi-Key, ComponentLink1URL=http://www.yageo.com/documents/recent/PYu-PU_51_RoHS_L_6.pdf?src-supplier=Digi-Key, ComponentLink2Description=http://www.yageo.com/documents/recent/PYu-PU_51_RoHS_L_3.pdf?src-supplier=Digi-Key, ComponentLink2URL=http://www.yageo.com/documents/recent/PYu-PU_51_RoHS_L_3.pdf?src-supplier=Digi-Key, Composition="Metal Element", Features="Moisture Resistant,Automotive AEC-Q200", Height=0.015inch, Length=0.591inch, Manufacturer Part Number=PU5931FKMP70R004L, Number of Terminations=2, Packaging="Cut Tape", Pricing 1="1=2,01000, 10=1,78200, 25=1,65280, 50=1,55540, 100=1,36110, 250=1,16660, 500=0,97218 (USD)", RoHS=Yes, Stock 1=1315, Supplier 1=Digi-Key, Width=0.305inch
R619: library part Resistor, Case/Package=0402, Case Code (Metric)=1005, Manufacturer="Stackpole Electronics", Manufacturer Part Number=RMCF0402FT1K91, Max Operating Temperature=155°C, Max Power Dissipation=63mW, Min Operating Temperature=-55°C, Supplier Part Number 1=RMCF0402FT1K91CT-ND, Temperature Coefficient=100ppm/°C, Tolerance=1%, Case Code (Imperial)=0402, ComponentLink1Description=http://components.arrow.com/part/dataview/51399400S357618N1174?src-supplier=Arrow, ComponentLink1URL=http://components.arrow.com/part/dataview/51399400S357618N1174?src-supplier=Arrow, ComponentLink2Description=https://www.seielect.com/Catalog/SEI-RMCF_RMCP.pdf?src-supplier=Digi-Key, ComponentLink2URL=https://www.seielect.com/Catalog/SEI-RMCF_RMCP.pdf?src-supplier=Digi-Key, ComponentLink3Description=https://www.seielect.com/catalog/SEI-RMCF_RMCP.pdf?src-supplier=Avnet, ComponentLink3URL=https://www.seielect.com/catalog/SEI-RMCF_RMCP.pdf?src-supplier=Avnet, ComponentLink4Description=https://www.seielect.com/catalog/SEI-Packaging.pdf?src-supplier=Digi-Key, ComponentLink4URL=https://www.seielect.com/catalog/SEI-Packaging.pdf?src-supplier=Digi-Key, Composition="Thick Film", Contact Plating=Tin,Matte, Features="Automotive AEC-Q200", Height=0.016inch, Lead Free="Lead Free", Length=0.039inch, Mount="Surface Mount", Number of Terminations=2, Packaging="Tape and Reel", Pricing 1="1 = 0,10000, 10 = 0,01400, 100 = 0,00580, 1000 = 0,00262, 2500 = 0,00228, 5000 = 0,00188 (USD)", Radiation Hardening=No, Resistance=1.91kR, RoHS=Yes, Stock 1=24353, Supplier 1=Digi-Key, Width=0.02inch
R620: library part Resistor, Case/Package=0402, Case Code (Metric)=1005, Manufacturer=Yageo, Manufacturer Part Number=RC0402FR-072KL, Max Operating Temperature=155°C, Max Power Dissipation=63mW, Min Operating Temperature=-55°C, Package Quantity=1, Supplier Part Number 1=311-2KLRCT-ND, Temperature Coefficient=100ppm/°C, Tolerance=1%, Voltage Rating=50V, Case Code (Imperial)=0402, ComponentLink1Description=https://datasheet.ciiva.com/11808/0900766b80c66297-11808787.pdf?src-supplier=RSComponents, ComponentLink1URL=https://datasheet.ciiva.com/11808/0900766b80c66297-11808787.pdf?src-supplier=RSComponents, ComponentLink2Description=https://datasheet.ciiva.com/2453/pyu-r-int-thick-7-2453634.pdf?src-supplier=Digi-Key, ComponentLink2URL=https://datasheet.ciiva.com/2453/pyu-r-int-thick-7-2453634.pdf?src-supplier=Digi-Key, ComponentLink3Description=https://datasheet.ciiva.com/2453/pyu-r-int-thick-7-2453635.pdf?src-supplier=Digi-Key, ComponentLink3URL=https://datasheet.ciiva.com/2453/pyu-r-int-thick-7-2453635.pdf?src-supplier=Digi-Key, ComponentLink4Description=https://datasheet.ciiva.com/2453/pyu-r-int-thick-7-2453636.pdf?src-supplier=Digi-Key, ComponentLink4URL=https://datasheet.ciiva.com/2453/pyu-r-int-thick-7-2453636.pdf?src-supplier=Digi-Key, ComponentLink5Description=https://datasheet.ciiva.com/15189/getdatasheetpartid-358921-15189414.pdf?src-supplier=Verical, ComponentLink5URL=https://datasheet.ciiva.com/15189/getdatasheetpartid-358921-15189414.pdf?src-supplier=Verical, ComponentLink6Description=https://datasheet.ciiva.com/12667/pyu-rc0402-51-rohs-l-6-r-12667451.pdf?src-supplier=Mouser, ComponentLink6URL=https://datasheet.ciiva.com/12667/pyu-rc0402-51-rohs-l-6-r-12667451.pdf?src-supplier=Mouser, ComponentLink7Description=https://datasheet.ciiva.com/7983/1018594-7983517.pdf?src-supplier=Element14, ComponentLink7URL=https://datasheet.ciiva.com/7983/1018594-7983517.pdf?src-supplier=Element14, ComponentLink8Description=https://datasheet.ciiva.com/7849/1018594-7849934.pdf?src-supplier=Element14, ComponentLink8URL=https://datasheet.ciiva.com/7849/1018594-7849934.pdf?src-supplier=Element14, ComponentLink9Description=https://datasheet.ciiva.com/7849/1018594-7849935.pdf?src-supplier=Element14, ComponentLink9URL=https://datasheet.ciiva.com/7849/1018594-7849935.pdf?src-supplier=Element14, Composition="Thick Film", Depth=0.5mm, Features="Moisture Resistant", Height=0.016inch, Lead Free="Lead Free", Length=1mm, Military Standard=Not, Number of Terminations=2, Packaging="Tape and Reel", Power Rating=63mW, Pricing 1="1 = 0,10000, 10 = 0,01600, 100 = 0,00640, 1000 = 0,00289, 2500 = 0,00251, 5000 = 0,00207 (USD)", REACH SVHC=Unknown, Resistance=2kR, RoHS=Yes, Stock 1=9276818, Supplier 1=Digi-Key, Termination=SMD/SMT, Voltage Rating (DC)=50V, Width=0.02inch, Working Voltage=50V
R621: library part Resistor, Case/Package=0402, Case Code (Metric)=1005, Manufacturer="Stackpole Electronics", Manufacturer Part Number=RMCF0402FT147K, Max Operating Temperature=155°C, Max Power Dissipation=63mW, Min Operating Temperature=-55°C, Temperature Coefficient=100ppm/°C, Tolerance=1%, Case Code (Imperial)=0402, ComponentLink1Description=https://www.seielect.com/Catalog/SEI-RMCF_RMCP.pdf?src-supplier=Digi-Key, ComponentLink1URL=https://www.seielect.com/Catalog/SEI-RMCF_RMCP.pdf?src-supplier=Digi-Key, ComponentLink2Description=https://www.seielect.com/catalog/SEI-Packaging.pdf?src-supplier=Digi-Key, ComponentLink2URL=https://www.seielect.com/catalog/SEI-Packaging.pdf?src-supplier=Digi-Key, ComponentLink3Description=https://www.seielect.com/catalog/SEI-RMCF_RMCP.pdf?src-supplier=Avnet, ComponentLink3URL=https://www.seielect.com/catalog/SEI-RMCF_RMCP.pdf?src-supplier=Avnet, Composition="Thick Film", Contact Plating=Tin,Matte, Depth=0.5mm, Features="Automotive AEC-Q200", Height=0.016inch, Lead Free="Lead Free", Length=0.039inch, Military Standard=Not, Mount="Surface Mount", Number of Terminations=2, Packaging="Tape and Reel", Pricing 1="1 = 0,10000, 10 = 0,01400, 100 = 0,00580, 1000 = 0,00262, 2500 = 0,00228, 5000 = 0,00188 (USD)", Radiation Hardening=No, Resistance=147kR, RoHS=Yes, Stock 1=24917, Supplier 1=Digi-Key, Width=0.02inch
R622: library part Resistor, Case/Package=0402, Case Code (Metric)=1005, Manufacturer="Stackpole Electronics", Manufacturer Part Number=RMCF0402FT340K, Max Operating Temperature=155°C, Max Power Dissipation=63mW, Min Operating Temperature=-55°C, Supplier Part Number 1=RMCF0402FT340KCT-ND, Temperature Coefficient=100ppm/°C, Tolerance=1%, Case Code (Imperial)=0402, ComponentLink1Description=https://www.verical.com/server-webapp/html/getDatasheet?partID=689254&src-supplier=Verical, ComponentLink1URL=https://www.verical.com/server-webapp/html/getDatasheet?partID=689254&src-supplier=Verical, ComponentLink2Description=http://components.arrow.com/part/dataview/47811509S8404077N1174?src-supplier=Arrow, ComponentLink2URL=http://components.arrow.com/part/dataview/47811509S8404077N1174?src-supplier=Arrow, ComponentLink3Description=https://www.seielect.com/catalog/SEI-RMCF_RMCP.pdf?src-supplier=Avnet, ComponentLink3URL=https://www.seielect.com/catalog/SEI-RMCF_RMCP.pdf?src-supplier=Avnet, ComponentLink4Description=https://www.seielect.com/Catalog/SEI-RMCF_RMCP.pdf?src-supplier=Digi-Key, ComponentLink4URL=https://www.seielect.com/Catalog/SEI-RMCF_RMCP.pdf?src-supplier=Digi-Key, ComponentLink5Description=https://www.seielect.com/catalog/SEI-Packaging.pdf?src-supplier=Digi-Key, ComponentLink5URL=https://www.seielect.com/catalog/SEI-Packaging.pdf?src-supplier=Digi-Key, Composition="Thick Film", Contact Plating=Tin,Matte, Depth=0.5mm, Features="Automotive AEC-Q200", Height=0.016inch, Length=0.039inch, Military Standard=Not, Mount="Surface Mount", Number of Terminations=2, Packaging="Tape and Reel", Pricing 1="1 = 0,10000, 10 = 0,01400, 100 = 0,00580, 1000 = 0,00262, 2500 = 0,00228, 5000 = 0,00188 (USD)", Radiation Hardening=No, Resistance=340kR, RoHS=Yes, Stock 1=52105, Supplier 1=Digi-Key, Width=0.02inch